# Altium PCB SOM_PCB_6Layer.PcbDoc (part 1 of 6)
Units mil, origin at the board's own origin, x right, y up, seen from the top; angles counter-clockwise.
Board outline 1230 x 2725 mil, 6 copper layers (Top Layer, GND+SHIELD, MidLayer1, MidLayer2, PWR, Bottom Layer), stack 60.8 mil thick; 76 components, 194 nets, 972 pads, 577 vias.
Unrouted connection lines stored in the file: 151.
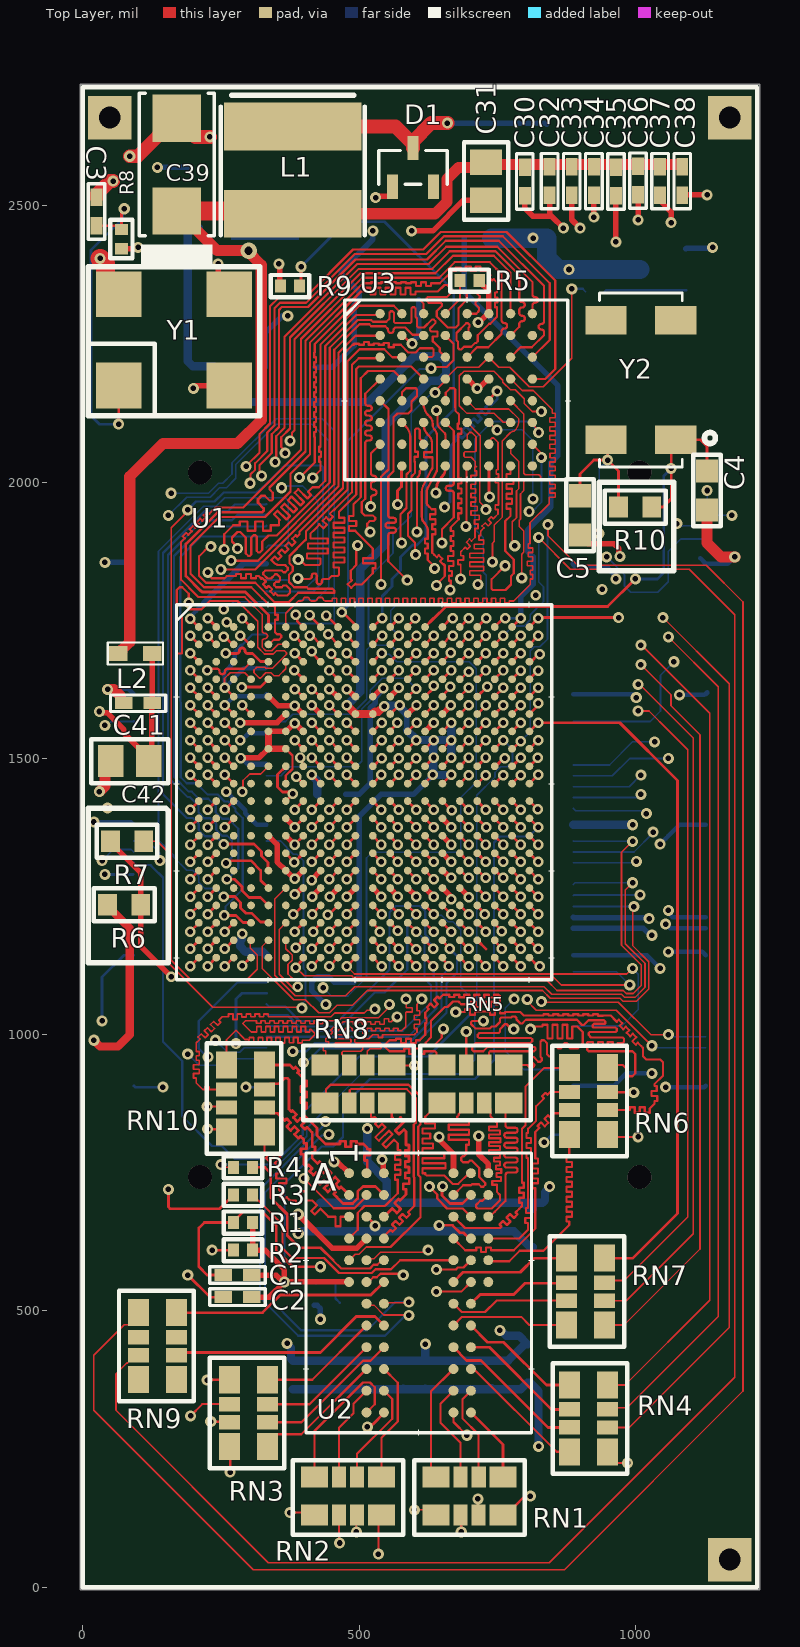
[diagram p0: Top Layer view]
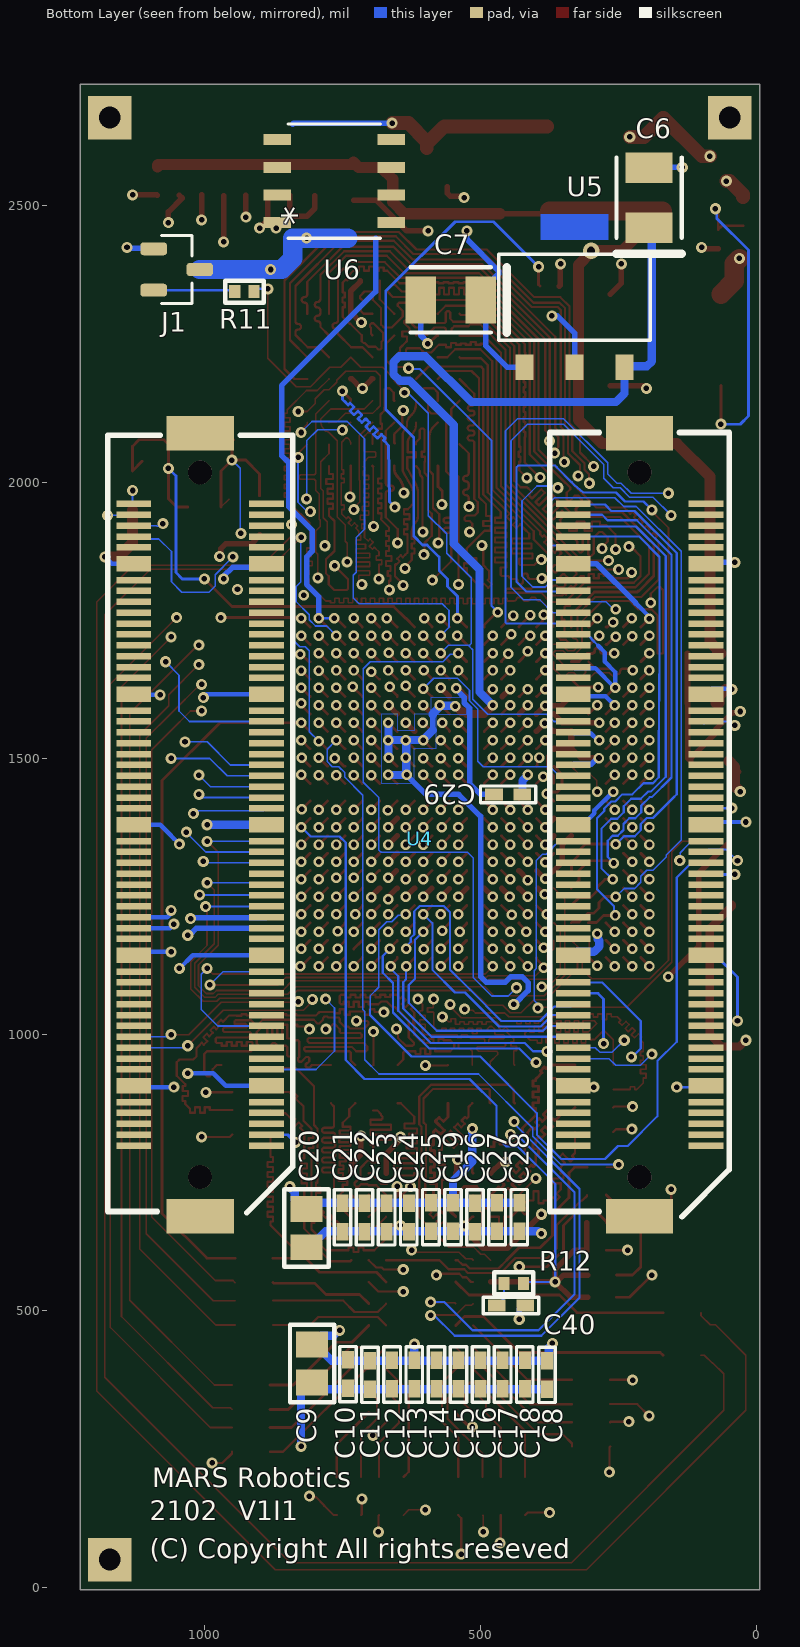
[diagram p1: Bottom Layer view, seen from below]
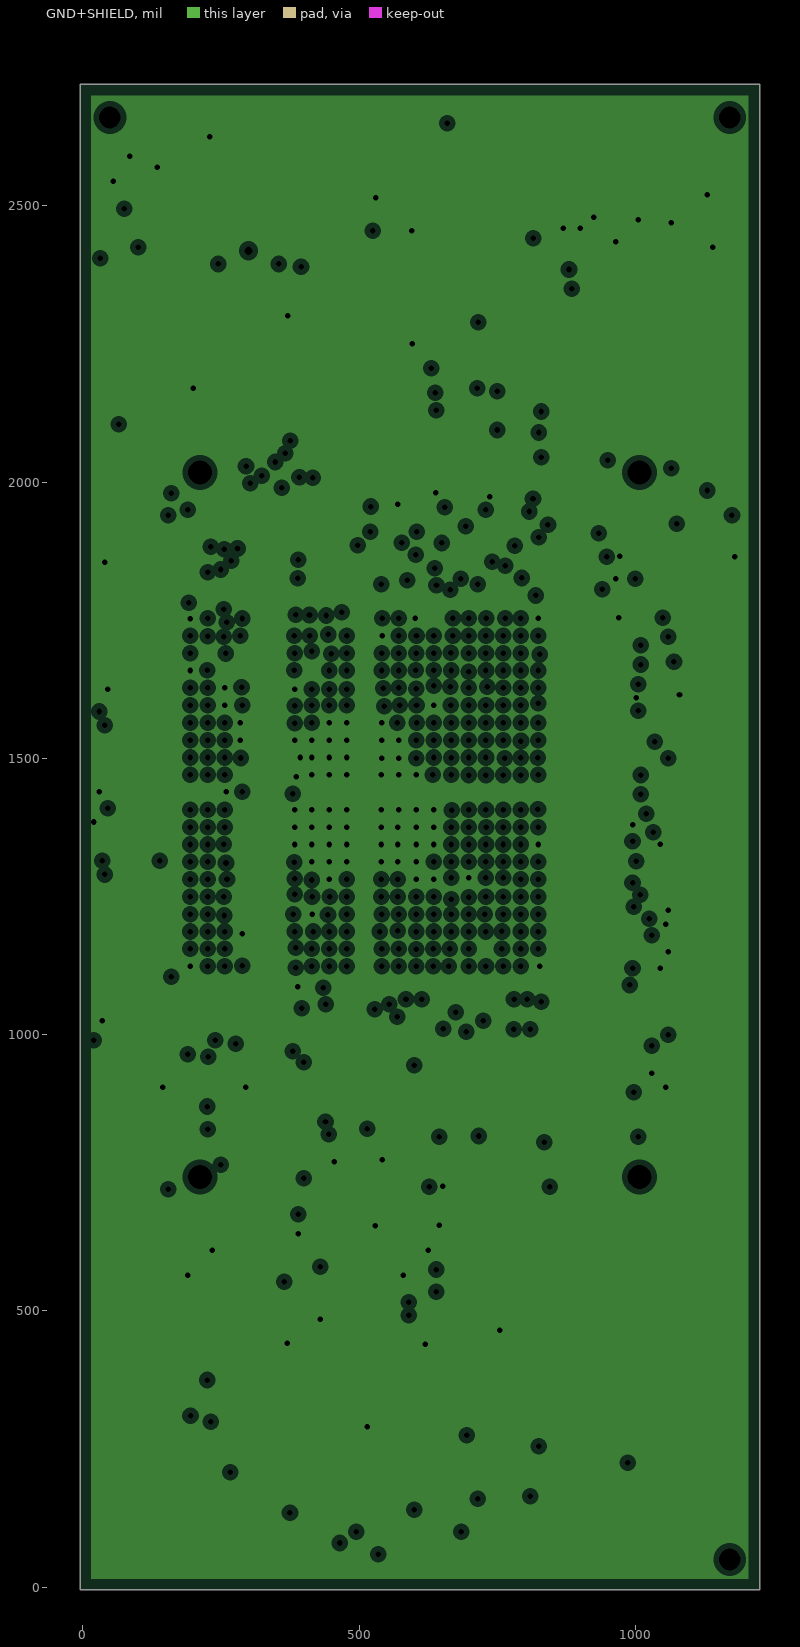
[diagram p2: GND+SHIELD, clearances drawn from the general rule]
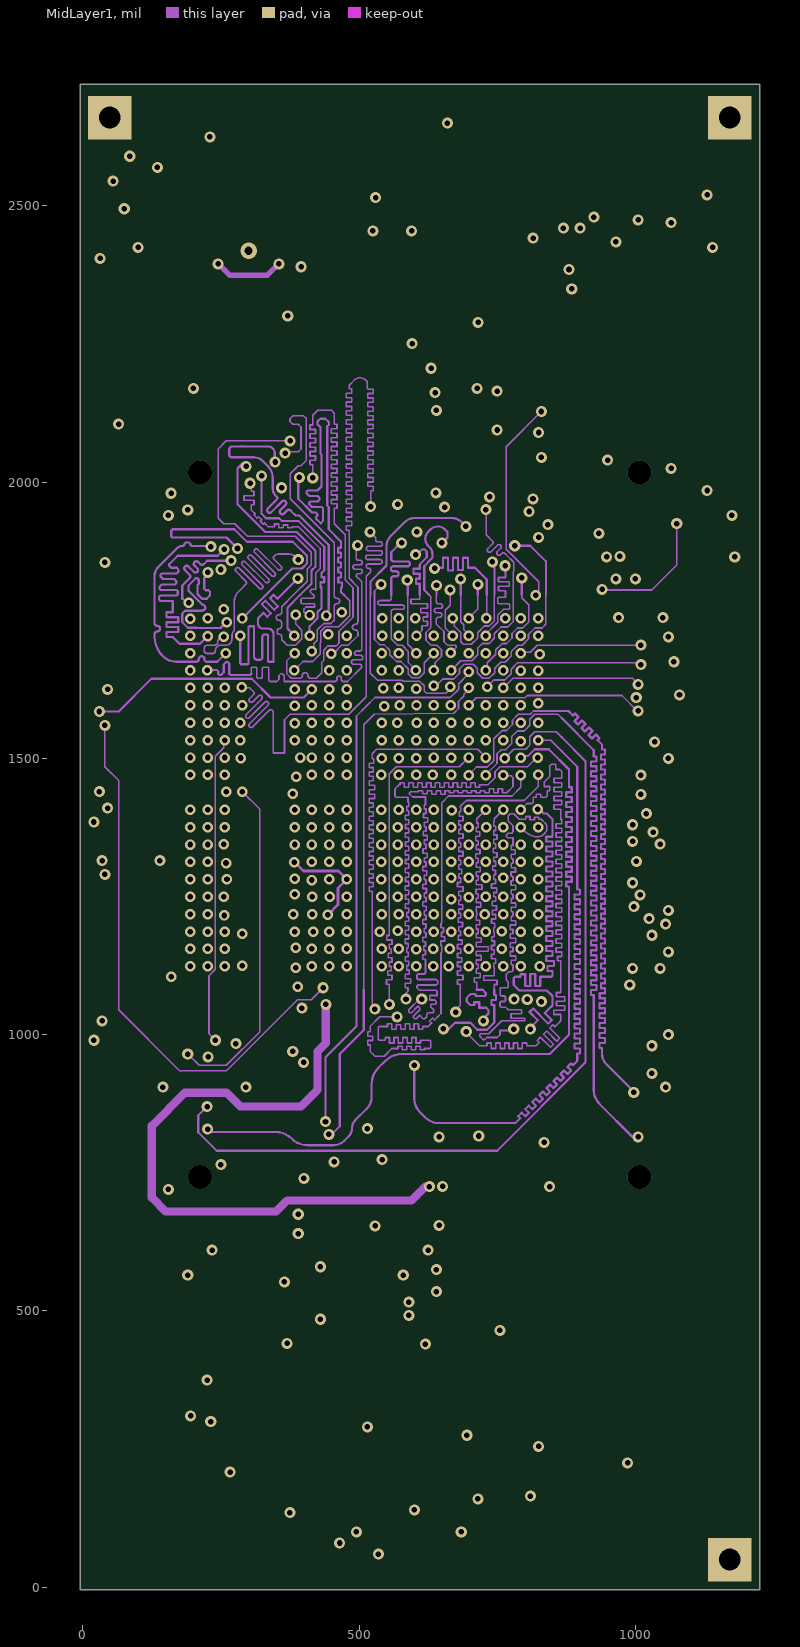
[diagram p3: MidLayer1]
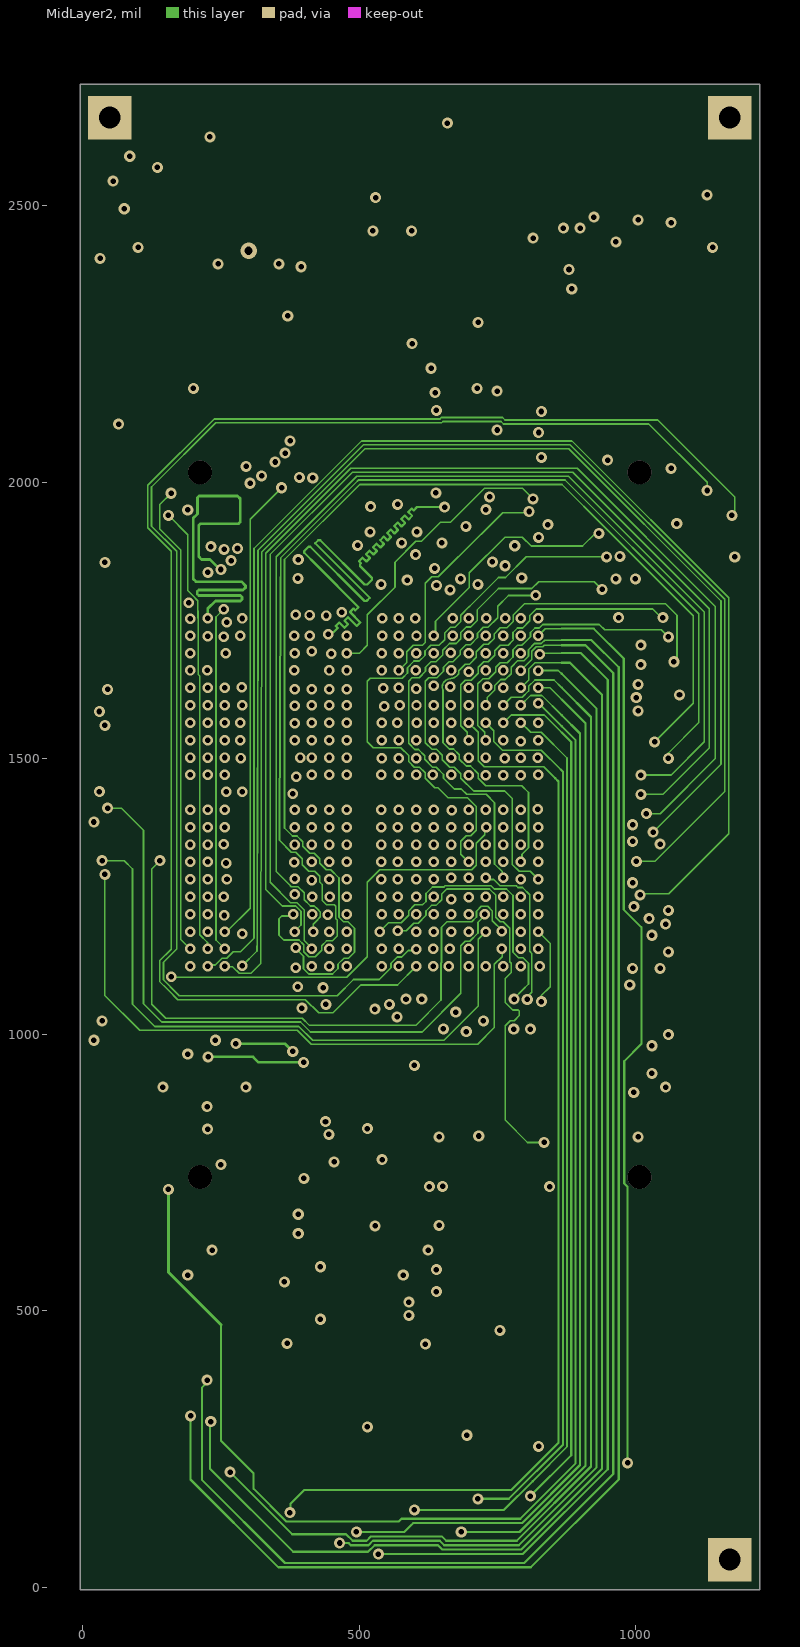
[diagram p4: MidLayer2]
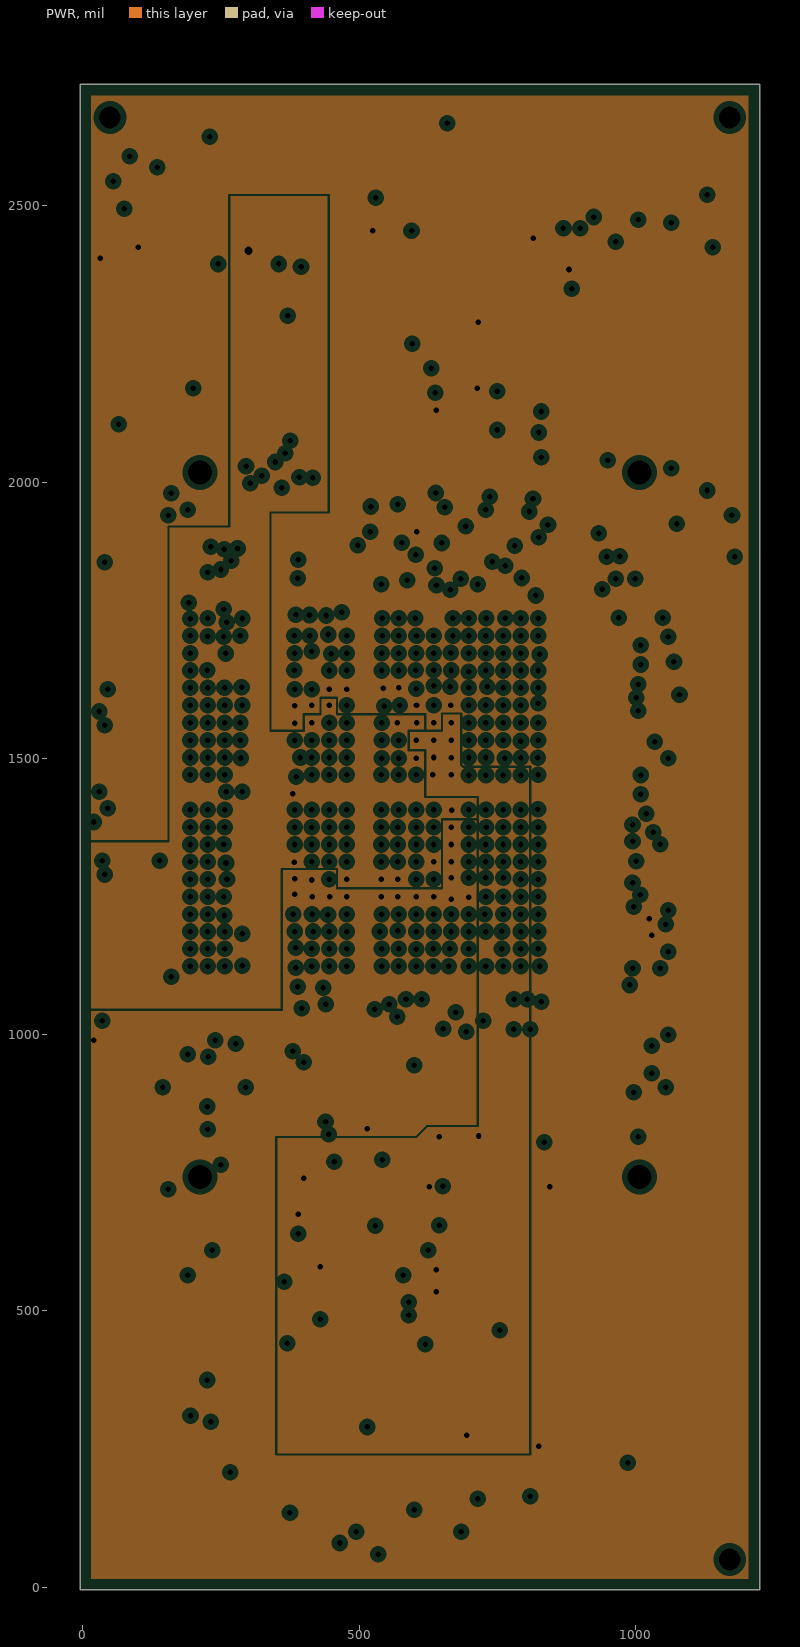
[diagram p5: PWR, clearances drawn from the general rule]

## Layer stack, top to bottom
Top Solder: solder mask 0.4, Solder Resist, Dk 3.5
Top Layer: signal copper 1.4
Dielectric1: core 9, FR-4, Dk 4.8
GND+SHIELD: plane copper 1.4, net GND
Dielectric4: prepreg 4.2, FR-4, Dk 4.8
MidLayer1: signal copper 1.4
Dielectric2: core 26, FR-4, Dk 4.8
MidLayer2: signal copper 1.4
Dielectric3: prepreg 4.2, FR-4, Dk 4.8
PWR: plane copper 1.4, net (Multiple Nets)
Dielectric5: core 9, FR-4, Dk 4.8
Bottom Layer: signal copper 1.4
Bottom Solder: solder mask 0.4, Solder Resist, Dk 3.5

## Board outline
-5,-5 25,-5 1225,-5 1225,2720 -5,2720 -5,0

## Design rules (kind name [scope] priority, off if disabled: settings)
Clearance Clearance_BGA [WithinRoom('BGA')] p1: gap=3 ignorepadtopadclearanceinfootprint=FALSE
Clearance [All] p2: gap=4 ignorepadtopadclearanceinfootprint=FALSE
DiffPairsRouting DiffPairsRouting_Diff90 [InDifferentialPair('DDR_DCLK0') And  Not WithinRoom('BGA')] p1: maxlimit=40 minlimit=3 mostfreqgap=25 toplayer_maxgap=6 toplayer_prefgap=4 toplayer_minwidth=3 toplayer_maxwidth=5 toplayer_prefwidth=4 midlayer1_mingap=4 midlayer1_minwidth=4 midlayer1_maxwidth=4 midlayer1_prefwidth=4 midlayer2_maxgap=6 midlayer2_prefgap=4 midlayer2_minwidth=3 midlayer2_maxwidth=5 midlayer2_prefwidth=4 bottomlayer_maxgap=6 bottomlayer_prefgap=4 bottomlayer_minwidth=3 bottomlayer_maxwidth=5 bottomlayer_prefwidth=4 maxuncoupledlength=500
DiffPairsRouting [All] p2: maxlimit=10 minlimit=10 mostfreqgap=10 toplayer_minwidth=15 toplayer_maxwidth=15 toplayer_prefwidth=15 midlayer1_minwidth=15 midlayer1_maxwidth=15 midlayer1_prefwidth=15 midlayer2_minwidth=15 midlayer2_maxwidth=15 midlayer2_prefwidth=15 bottomlayer_minwidth=15 bottomlayer_maxwidth=15 bottomlayer_prefwidth=15 maxuncoupledlength=500
HoleToHoleClearance [All] p1: gap=0 allowstackedmicrovias=TRUE
MatchedLengths DDR_DATA_LENGTH_MATCH [InNetClass('DDR_D[0..15]')] p1: tolerance=60 checknetsindiffpair=FALSE checkdiffpairvsdiffpair=TRUE checkxsignals=TRUE checkothers=TRUE
MatchedLengths DDR_RES_DATA_LENGTH_MATCH [InNetClass('DDR_RES_D[0..15]')] p2: tolerance=250 checknetsindiffpair=FALSE checkdiffpairvsdiffpair=TRUE checkxsignals=TRUE checkothers=TRUE
MatchedLengths FLASH_DATA_LENGTH_MATCH [InNetClass('FLASH_DATA')] p3: tolerance=100 checknetsindiffpair=FALSE checkdiffpairvsdiffpair=TRUE checkxsignals=TRUE checkothers=TRUE
MatchedLengths FLASH_ADD_LENGTH_MATCH [InNetClass('FLASH_A[1..24]')] p4: tolerance=250 checknetsindiffpair=FALSE checkdiffpairvsdiffpair=TRUE checkxsignals=TRUE checkothers=TRUE
MinimumSolderMaskSliver [All] p1: minsoldermaskwidth=0
PlaneClearance [All] p1: clearance=10
PlaneConnect PlaneConnect_DIRECT [IsVia] p1: planeconnectstyle=Direct reliefexpansion=20 reliefentries=4 reliefconductorwidth=5 reliefairgap=10
PlaneConnect PlaneConnect_RELIEF [All] p2: planeconnectstyle=Relief reliefexpansion=10 reliefentries=4 reliefconductorwidth=20 reliefairgap=4
PolygonConnect [All] p1: connectstyle=Relief reliefconductorwidth=10 reliefentries=4 polygonreliefangle="90 Angle" airgapwidth=10
RoomDefinition BGA [InComponentClass('Room Definition 1')] p1: confinementstyle=ConfineIn formatcopy=TRUE lockcomponents=FALSE outline 151.75,1081.24 151.75,1796.24 866.75,1796.24 866.75,1081.24
RoutingVias RoutingVias_BGA [WithinRoom('BGA')] p1: holewidth=10 width=19 viastyle="Through Hole" minholewidth=10 minwidth=19 maxholewidth=10 maxwidth=19
RoutingVias [All] p2: holewidth=10 width=20 viastyle="Through Hole" minholewidth=10 minwidth=20 maxholewidth=40 maxwidth=45
SilkToSilkClearance [All] p1: silktosilkclearance=0
SilkToSolderMaskClearance [IsPad] p1: minsilkscreentomaskgap=0 clearancetoexposedcopper=TRUE
SolderMaskExpansion [All] p1: expansion=4 istentingtop=FALSE
Width Width_BGA [WithinRoom('BGA')] p1: maxlimit=15 minlimit=3 preferedwidth=5 midlayer1_prefwidth=3 midlayer2_prefwidth=3 minimp=50.000000 maximp=50.000000 favimp=50.000000
Width [All] p2: maxlimit=35 minlimit=3 preferedwidth=5
23 further rules are at their usual default settings.

## Classes and differential pairs
component class Designator: U1
net class UART: UART2_RX UART2_TX UART3_RX UART3_TX
net class TIMER: TACLK6 TMR0 TMR1 TMR2 TMR3 TMR4 TMR5 TMR6 UART3_RX
net class SD_DATA: RSCLK0 SD_CLK SD_CMD SD_D0 SD_D1 SD_D2 SD_D3
net class JTAG: JTAG_E\M\U\ JTAG_T\R\S\T\ JTAG_TCK JTAG_TDI JTAG_TDO JTAG_TMS
net class FLASH_DATA: FLASH_D0 FLASH_D1 FLASH_D2 FLASH_D3 FLASH_D4 FLASH_D5 FLASH_D6 FLASH_D7 FLASH_D8 FLASH_D9 FLASH_D10 FLASH_D11 FLASH_D12 FLASH_D13 FLASH_D14 FLASH_D15
net class FLASH_D[0..15]: FLASH_D0 FLASH_D1 FLASH_D2 FLASH_D3 FLASH_D4 FLASH_D5 FLASH_D6 FLASH_D7 FLASH_D8 FLASH_D9 FLASH_D10 FLASH_D11 FLASH_D12 FLASH_D13 FLASH_D14 FLASH_D15
net class FLASH_CLK: FLASH_CLK
net class FLASH_ADDR: FLASH_A1 FLASH_A2 FLASH_A3 FLASH_A4 FLASH_A5 FLASH_A6 FLASH_A7 FLASH_A8 FLASH_A9 FLASH_A10 FLASH_A11 FLASH_A12 FLASH_A13 FLASH_A14 FLASH_A15 FLASH_A16 FLASH_A17 FLASH_A18 FLASH_A19 FLASH_A20 FLASH_A21 FLASH_A22 FLASH_A23
net class FLASH_A[1..24]: FLASH_A1 FLASH_A2 FLASH_A3 FLASH_A4 FLASH_A5 FLASH_A6 FLASH_A7 FLASH_A8 FLASH_A9 FLASH_A10 FLASH_A11 FLASH_A12 FLASH_A13 FLASH_A14 FLASH_A15 FLASH_A16 FLASH_A17 FLASH_A18 FLASH_A19 FLASH_A20 FLASH_A21 FLASH_A22 FLASH_A23
net class DIFF100: DDR_DCLK0_N DDR_DCLK0_P
net class DDR_RES_D[0..15]: DDR_RES_D0 DDR_RES_D1 DDR_RES_D2 DDR_RES_D3 DDR_RES_D4 DDR_RES_D5 DDR_RES_D6 DDR_RES_D7 DDR_RES_D8 DDR_RES_D9 DDR_RES_D10 DDR_RES_D11 DDR_RES_D12 DDR_RES_D13 DDR_RES_D14 DDR_RES_D15
net class DDR_RES_A[0..12]: DDR_RES_A0 DDR_RES_A1 DDR_RES_A2 DDR_RES_A3 DDR_RES_A4 DDR_RES_A5 DDR_RES_A6 DDR_RES_A7 DDR_RES_A8 DDR_RES_A9 DDR_RES_A10 DDR_RES_A11 DDR_RES_A12
net class DDR_DATA: DDR_D0 DDR_D1 DDR_D2 DDR_D3 DDR_D4 DDR_D5 DDR_D6 DDR_D7 DDR_D8 DDR_D9 DDR_D10 DDR_D11 DDR_D12 DDR_D13 DDR_D14 DDR_D15 DDR_RES_D0 DDR_RES_D1 DDR_RES_D2 DDR_RES_D3 DDR_RES_D4 DDR_RES_D5 DDR_RES_D6 DDR_RES_D7 DDR_RES_D8 DDR_RES_D9 DDR_RES_D10 DDR_RES_D11 DDR_RES_D12 DDR_RES_D13 DDR_RES_D14 DDR_RES_D15
net class DDR_D[0..15]: DDR_D0 DDR_D1 DDR_D2 DDR_D3 DDR_D4 DDR_D5 DDR_D6 DDR_D7 DDR_D8 DDR_D9 DDR_D10 DDR_D11 DDR_D12 DDR_D13 DDR_D14 DDR_D15
net class DDR_ADDR: DDR_A0 DDR_A1 DDR_A2 DDR_A3 DDR_A4 DDR_A5 DDR_A6 DDR_A7 DDR_A8 DDR_A9 DDR_A10 DDR_A11 DDR_A12 DDR_RES_A0 DDR_RES_A1 DDR_RES_A2 DDR_RES_A3 DDR_RES_A4 DDR_RES_A5 DDR_RES_A6 DDR_RES_A7 DDR_RES_A8 DDR_RES_A9 DDR_RES_A10 DDR_RES_A11 DDR_RES_A12
net class DDR_A[0..12]: DDR_A0 DDR_A1 DDR_A2 DDR_A3 DDR_A4 DDR_A5 DDR_A6 DDR_A7 DDR_A8 DDR_A9 DDR_A10 DDR_A11 DDR_A12
component class Designator: C6 C7 C8 C9 C10 C11 C12 C13 C14 C15 C16 C17 C18 C19 C20 C21 C22 C23 C24 C25 C26 C27 C28 C29 C30 C31 C32 C33 C34 C35 C36 C37 C38 C39 C40 C41 C42 D1 L1 L2 R12 U5 U6
differential pair DDR_DCLK0: +DDR_DCLK0_P -DDR_DCLK0_N

## Components (designator, comment, footprint, x,y, rotation, side; value= is the part's Value field where it differs from the comment)
C1 "0.1 uF" CAP0402 280,565 r180 top
C2 "0.1 uF" CAP0402 280,525 r0 top
C3 "0.1µF" CAP0402 25,2490 r270 top
C4 "18pF" CAP0603 1130,1985 r90 top
C5 "18pF" CAP0603 900,1940 r90 top
C6 "1 uF" CAP_TANT_B 195,2515 r90 bottom
C7 "1 uF" CAP_TANT_B 554.13,2330 r0 bottom
C8 "0.01uF" CAP0402 380,384.24 r270 bottom
C9 "10uF" CAP0805 805,405 r270 bottom
C10 "0.01uF" CAP0402 740,385.76 r270 bottom
C11 "0.01uF" CAP0402 700,384.24 r270 bottom
C12 "0.01uF" CAP0402 660,385 r270 bottom
C13 "0.01uF" CAP0402 620,385 r270 bottom
C14 "0.01uF" CAP0402 580,385 r270 bottom
C15 "0.01uF" CAP0402 540,385 r270 bottom
C16 "0.01uF" CAP0402 500,385 r270 bottom
C17 "0.01uF" CAP0402 460,385 r270 bottom
C18 "0.01uF" CAP0402 420,385 r270 bottom
C19 "0.01uF" CAP0402 550,670 r90 bottom
C20 "10uF" CAP0805 815,650 r90 bottom
C21 "0.01uF" CAP0402 750,669.24 r90 bottom
C22 "0.01uF" CAP0402 710,669.24 r90 bottom
C23 "0.01uF" CAP0402 670,669.24 r90 bottom
C24 "0.01uF" CAP0402 630,669.24 r90 bottom
C25 "0.01uF" CAP0402 590,670 r90 bottom
C26 "0.01uF" CAP0402 510,669.24 r90 bottom
C27 "0.01uF" CAP0402 470,670 r90 bottom
C28 "0.01uF" CAP0402 430,670 r90 bottom
C29 "0.01uF" CAP0402 450,1435 r0 bottom
C30 "0.01uF" CAP0402 800,2544.24 r90 top
C31 "10uF" CAP0805 730,2545 r90 top
C32 "0.01uF" CAP0402 845,2545 r90 top
C33 "0.01uF" CAP0402 885,2545 r90 top
C34 "0.01uF" CAP0402 925,2545 r90 top
C35 "0.01uF" CAP0402 965,2544.24 r90 top
C36 "0.01uF" CAP0402 1005,2545.76 r90 top
C37 "0.01uF" CAP0402 1045,2545 r90 top
C38 "0.01uF" CAP0402 1085,2545 r90 top
C39 "100 uF" CAP_TANT_C 170,2575 r90 top
C40 "0.01uF" CAP0402 445,510 r0 bottom
C41 "0.01uF" CAP0402 100,1600 r0 top
C42 "10uF" CAP0805 85,1495 r0 top
D1 "ZHCS1000" SOT23_3_TOS-L 597.6,2570 r0 top
J1 "TCM809SENB713" SOT-23B 1050,2385 r180 bottom
L1 "10uH" IND_5818_WE-TPC 380,2565 r270 top
L2 "600 Ohms @ 100MHz" IND-0603 95,1690 r0 top
R1 "1K" RES0402 290,660 r180 top
R2 "1K" RES0402 290,610 r0 top
R3 "33R" RES0402 290,710 r0 top
R4 "33R" RES0402 290,760 r0 top
R5 "10K" RES0402 700,2365 r0 top
R6 "0R" RES0603 75,1235 r180 top
R7 "0R" RES0603 80.12,1350 r0 top
R8 "10K" RES0402 70,2440 r90 top
R9 "33R" RES0402 375,2355 r0 top
R10 "10M" RES0603 999.88,1955 r180 top
R11 "470R" RES0402 927.48,2345 r180 bottom
R12 "1R" RES0402 440,550 r180 bottom
RN1 "CAY16-220J4LF" BO_CAY16 700,165 r90 top
RN2 "CAY16-220J4LF" BO_CAY16 480,165 r90 top
RN3 "CAY16-220J4LF" BO_CAY16 300,315 r0 top
RN4 "CAY16-220J4LF" BO_CAY16 915.5,305.5 r180 top
RN5 "CAY16-220J4LF" BO_CAY16 710.5,910.5 r270 top
RN6 "CAY16-220J4LF" BO_CAY16 915,880 r180 top
RN7 "CAY16-220J4LF" BO_CAY16 910,535 r180 top
RN8 "CAY16-220J4LF" BO_CAY16 498.65,910.5 r270 top
RN9 "CAY16-220J4LF" BO_CAY16 135.5,436.35 r0 top
RN10 "CAY16-220J4LF" BO_CAY16 294.5,884.5 r0 top
U1 "ADSP-BF548BBCZ-5A" BC_400_1_ADI 509.25,1438.74 r0 top
U2 "MT46V32M16CY-5B IT:J" FBGA60_10X12P5_MRN 607.99,532.83 r0 top
U3 "PC28F128P33BF60A" BGA64_8X10_MRN 675.94,2167.2 r0 top
U4 "CM-BF548" CM-BF548 610,1380 r270 top locked
U5 "TC1262-2.5VDBTR" SOT-223 330,2335 r180 bottom
U6 "FDS9926A" SOIC8 765,2545 r90 bottom
Y1 "25MHz" 4-SMD 65,2340.35 r0 top
Y2 "32.768kHz" XTAL_ECS-.327-12.5-17-TR 1010,2185 r90 top

## Footprints (in the part's own frame and the unit in brackets; to place one, negate y for a bottom-side part, rotate by r counter-clockwise, add the part's x,y. Pads: shape width x height; smd on the part's side, far side on the other; paste and mask are expansions set on the pad)
4-SMD [mm]
  rect 2.1x2.1 smd: 1(0,-4.2) 2(5.08,-4.2) 3(5.08,0) 4(0,0)
  silkscreen extent -1.4,-5.59 6.48,1.27, body extent -1.02,-4.44 5.98,0.56, height 1.51
BC_400_1_ADI [mil]
  round 14 smd paste+0 mask+0: A1(-299.21,299.21) A2(-267.72,299.21) A3(-236.22,299.21) A4(-204.72,299.21) A5(-173.23,299.21) A6(-141.73,299.21) A7(-110.24,299.21) A8(-78.74,299.21) A9(-47.24,299.21) A10(-15.75,299.21) A11(15.75,299.21) A12(47.24,299.21) A13(78.74,299.21) A14(110.24,299.21) A15(141.73,299.21) A16(173.23,299.21) A17(204.72,299.21) A18(236.22,299.21) A19(267.72,299.21) A20(299.21,299.21) B1(-299.21,267.72) B2(-267.72,267.72) B3(-236.22,267.72) B4(-204.72,267.72) B5(-173.23,267.72) B6(-141.73,267.72) B7(-110.24,267.72) B8(-78.74,267.72) B9(-47.24,267.72) B10(-15.75,267.72) B11(15.75,267.72) B12(47.24,267.72) B13(78.74,267.72) B14(110.24,267.72) B15(141.73,267.72) B16(173.23,267.72) B17(204.72,267.72) B18(236.22,267.72) B19(267.72,267.72) B20(299.21,267.72) C1(-299.21,236.22) C2(-267.72,236.22) C3(-236.22,236.22) C4(-204.72,236.22) C5(-173.23,236.22) C6(-141.73,236.22) C7(-110.24,236.22) C8(-78.74,236.22) C9(-47.24,236.22) C10(-15.75,236.22) C11(15.75,236.22) C12(47.24,236.22) C13(78.74,236.22) C14(110.24,236.22) C15(141.73,236.22) C16(173.23,236.22) C17(204.72,236.22) C18(236.22,236.22) C19(267.72,236.22) C20(299.21,236.22) D1(-299.21,204.72) D2(-267.72,204.72) D3(-236.22,204.72) D4(-204.72,204.72) D5(-173.23,204.72) D6(-141.73,204.72) D7(-110.24,204.72) D8(-78.74,204.72) D9(-47.24,204.72) D10(-15.75,204.72) D11(15.75,204.72) D12(47.24,204.72) D13(78.74,204.72) D14(110.24,204.72) D15(141.73,204.72) D16(173.23,204.72) D17(204.72,204.72) D18(236.22,204.72) D19(267.72,204.72) D20(299.21,204.72) E1(-299.21,173.23) E2(-267.72,173.23) E3(-236.22,173.23) E4(-204.72,173.23) E5(-173.23,173.23) E6(-141.73,173.23) E7(-110.24,173.23) E8(-78.74,173.23) E9(-47.24,173.23) E10(-15.75,173.23) E11(15.75,173.23) E12(47.24,173.23) E13(78.74,173.23) E14(110.24,173.23) E15(141.73,173.23) E16(173.23,173.23) E17(204.72,173.23) E18(236.22,173.23) E19(267.72,173.23) E20(299.21,173.23) F1(-299.21,141.73) F2(-267.72,141.73) F3(-236.22,141.73) F4(-204.72,141.73) F5(-173.23,141.73) F6(-141.73,141.73) F7(-110.24,141.73) F8(-78.74,141.73) F9(-47.24,141.73) F10(-15.75,141.73) F11(15.75,141.73) F12(47.24,141.73) F13(78.74,141.73) F14(110.24,141.73) F15(141.73,141.73) F16(173.23,141.73) F17(204.72,141.73) F18(236.22,141.73) F19(267.72,141.73) F20(299.21,141.73) G1(-299.21,110.24) G2(-267.72,110.24) G3(-236.22,110.24) G4(-204.72,110.24) G5(-173.23,110.24) G6(-141.73,110.24) G7(-110.24,110.24) G8(-78.74,110.24) G9(-47.24,110.24) G10(-15.75,110.24) G11(15.75,110.24) G12(47.24,110.24) G13(78.74,110.24) G14(110.24,110.24) G15(141.73,110.24) G16(173.23,110.24) G17(204.72,110.24) G18(236.22,110.24) G19(267.72,110.24) G20(299.21,110.24) H1(-299.21,78.74) H2(-267.72,78.74) H3(-236.22,78.74) H4(-204.72,78.74) H5(-173.23,78.74) H6(-141.73,78.74) H7(-110.24,78.74) H8(-78.74,78.74) H9(-47.24,78.74) H10(-15.75,78.74) H11(15.75,78.74) H12(47.24,78.74) H13(78.74,78.74) H14(110.24,78.74) H15(141.73,78.74) H16(173.23,78.74) H17(204.72,78.74) H18(236.22,78.74) H19(267.72,78.74) H20(299.21,78.74) J1(-299.21,47.24) J2(-267.72,47.24) J3(-236.22,47.24) J4(-204.72,47.24) J5(-173.23,47.24) J6(-141.73,47.24) J7(-110.24,47.24) J8(-78.74,47.24) J9(-47.24,47.24) J10(-15.75,47.24) J11(15.75,47.24) J12(47.24,47.24) J13(78.74,47.24) J14(110.24,47.24) J15(141.73,47.24) J16(173.23,47.24) J17(204.72,47.24) J18(236.22,47.24) J19(267.72,47.24) J20(299.21,47.24) K1(-299.21,15.75) K2(-267.72,15.75) K3(-236.22,15.75) K4(-204.72,15.75) K5(-173.23,15.75) K6(-141.73,15.75) K7(-110.24,15.75) K8(-78.74,15.75) K9(-47.24,15.75) K10(-15.75,15.75) K11(15.75,15.75) K12(47.24,15.75) K13(78.74,15.75) K14(110.24,15.75) K15(141.73,15.75) K16(173.23,15.75) K17(204.72,15.75) K18(236.22,15.75) K19(267.72,15.75) K20(299.21,15.75) L1(-299.21,-15.75) L2(-267.72,-15.75) L3(-236.22,-15.75) L4(-204.72,-15.75) L5(-173.23,-15.75) L6(-141.73,-15.75) L7(-110.24,-15.75) L8(-78.74,-15.75) L9(-47.24,-15.75) L10(-15.75,-15.75) L11(15.75,-15.75) L12(47.24,-15.75) L13(78.74,-15.75) L14(110.24,-15.75) L15(141.73,-15.75) L16(173.23,-15.75) L17(204.72,-15.75) L18(236.22,-15.75) L19(267.72,-15.75) L20(299.21,-15.75) M1(-299.21,-47.24) M2(-267.72,-47.24) M3(-236.22,-47.24) M4(-204.72,-47.24) M5(-173.23,-47.24) M6(-141.73,-47.24) M7(-110.24,-47.24) M8(-78.74,-47.24) M9(-47.24,-47.24) M10(-15.75,-47.24) M11(15.75,-47.24) M12(47.24,-47.24) M13(78.74,-47.24) M14(110.24,-47.24) M15(141.73,-47.24) M16(173.23,-47.24) M17(204.72,-47.24) M18(236.22,-47.24) M19(267.72,-47.24) M20(299.21,-47.24) N1(-299.21,-78.74) N2(-267.72,-78.74) N3(-236.22,-78.74) N4(-204.72,-78.74) N5(-173.23,-78.74) N6(-141.73,-78.74) N7(-110.24,-78.74) N8(-78.74,-78.74) N9(-47.24,-78.74) N10(-15.75,-78.74) N11(15.75,-78.74) N12(47.24,-78.74) N13(78.74,-78.74) N14(110.24,-78.74) N15(141.73,-78.74) N16(173.23,-78.74) N17(204.72,-78.74) N18(236.22,-78.74) N19(267.72,-78.74) N20(299.21,-78.74) P1(-299.21,-110.24) P2(-267.72,-110.24) P3(-236.22,-110.24) P4(-204.72,-110.24) P5(-173.23,-110.24) P6(-141.73,-110.24) P7(-110.24,-110.24) P8(-78.74,-110.24) P9(-47.24,-110.24) P10(-15.75,-110.24) P11(15.75,-110.24) P12(47.24,-110.24) P13(78.74,-110.24) P14(110.24,-110.24) P15(141.73,-110.24) P16(173.23,-110.24) P17(204.72,-110.24) P18(236.22,-110.24) P19(267.72,-110.24) P20(299.21,-110.24) R1(-299.21,-141.73) R2(-267.72,-141.73) R3(-236.22,-141.73) R4(-204.72,-141.73) R5(-173.23,-141.73) R6(-141.73,-141.73) R7(-110.24,-141.73) R8(-78.74,-141.73) R9(-47.24,-141.73) R10(-15.75,-141.73) R11(15.75,-141.73) R12(47.24,-141.73) R13(78.74,-141.73) R14(110.24,-141.73) R15(141.73,-141.73) R16(173.23,-141.73) R17(204.72,-141.73) R18(236.22,-141.73) R19(267.72,-141.73) R20(299.21,-141.73) T1(-299.21,-173.23) T2(-267.72,-173.23) T3(-236.22,-173.23) T4(-204.72,-173.23) T5(-173.23,-173.23) T6(-141.73,-173.23) T7(-110.24,-173.23) T8(-78.74,-173.23) T9(-47.24,-173.23) T10(-15.75,-173.23) T11(15.75,-173.23) T12(47.24,-173.23) T13(78.74,-173.23) T14(110.24,-173.23) T15(141.73,-173.23) T16(173.23,-173.23) T17(204.72,-173.23) T18(236.22,-173.23) T19(267.72,-173.23) T20(299.21,-173.23) U1(-299.21,-204.72) U2(-267.72,-204.72) U3(-236.22,-204.72) U4(-204.72,-204.72) U5(-173.23,-204.72) U6(-141.73,-204.72) U7(-110.24,-204.72) U8(-78.74,-204.72) U9(-47.24,-204.72) U10(-15.75,-204.72) U11(15.75,-204.72) U12(47.24,-204.72) U13(78.74,-204.72) U14(110.24,-204.72) U15(141.73,-204.72) U16(173.23,-204.72) U17(204.72,-204.72) U18(236.22,-204.72) U19(267.72,-204.72) U20(299.21,-204.72) V1(-299.21,-236.22) V2(-267.72,-236.22) V3(-236.22,-236.22) V4(-204.72,-236.22) V5(-173.23,-236.22) V6(-141.73,-236.22) V7(-110.24,-236.22) V8(-78.74,-236.22) V9(-47.24,-236.22) V10(-15.75,-236.22) V11(15.75,-236.22) V12(47.24,-236.22) V13(78.74,-236.22) V14(110.24,-236.22) V15(141.73,-236.22) V16(173.23,-236.22) V17(204.72,-236.22) V18(236.22,-236.22) V19(267.72,-236.22) V20(299.21,-236.22) W1(-299.21,-267.72) W2(-267.72,-267.72) W3(-236.22,-267.72) W4(-204.72,-267.72) W5(-173.23,-267.72) W6(-141.73,-267.72) W7(-110.24,-267.72) W8(-78.74,-267.72) W9(-47.24,-267.72) W10(-15.75,-267.72) W11(15.75,-267.72) W12(47.24,-267.72) W13(78.74,-267.72) W14(110.24,-267.72) W15(141.73,-267.72) W16(173.23,-267.72) W17(204.72,-267.72) W18(236.22,-267.72) W19(267.72,-267.72) W20(299.21,-267.72) Y1(-299.21,-299.21) Y2(-267.72,-299.21) Y3(-236.22,-299.21) Y4(-204.72,-299.21) Y5(-173.23,-299.21) Y6(-141.73,-299.21) Y7(-110.24,-299.21) Y8(-78.74,-299.21) Y9(-47.24,-299.21) Y10(-15.75,-299.21) Y11(15.75,-299.21) Y12(47.24,-299.21) Y13(78.74,-299.21) Y14(110.24,-299.21) Y15(141.73,-299.21) Y16(173.23,-299.21) Y17(204.72,-299.21) Y18(236.22,-299.21) Y19(267.72,-299.21) Y20(299.21,-299.21)
  silkscreen extent -344,-344 344,344, body extent -334,-334 334,334, height 67
BGA64_8X10_MRN [mil]
  round 17 smd paste+0 mask+0: A1(-137.8,137.8) A2(-98.43,137.8) A3(-59.06,137.8) A4(-19.68,137.8) A5(19.68,137.8) A6(59.06,137.8) A7(98.43,137.8) A8(137.8,137.8) B1(-137.8,98.43) B2(-98.43,98.43) B3(-59.06,98.43) B4(-19.68,98.43) B5(19.68,98.43) B6(59.06,98.43) B7(98.43,98.43) B8(137.8,98.43) C1(-137.8,59.06) C2(-98.43,59.06) C3(-59.06,59.06) C4(-19.68,59.06) C5(19.68,59.06) C6(59.06,59.06) C7(98.43,59.06) C8(137.8,59.06) D1(-137.8,19.69) D2(-98.43,19.69) D3(-59.06,19.69) D4(-19.68,19.69) D5(19.68,19.69) D6(59.06,19.69) D7(98.43,19.69) D8(137.8,19.69) E1(-137.8,-19.68) E2(-98.43,-19.68) E3(-59.06,-19.68) E4(-19.68,-19.68) E5(19.68,-19.68) E6(59.06,-19.68) E7(98.43,-19.68) E8(137.8,-19.68) F1(-137.8,-59.06) F2(-98.43,-59.06) F3(-59.06,-59.06) F4(-19.68,-59.06) F5(19.68,-59.06) F6(59.06,-59.06) F7(98.43,-59.06) F8(137.8,-59.06) G1(-137.8,-98.43) G2(-98.43,-98.43) G3(-59.06,-98.43) G4(-19.68,-98.43) G5(19.68,-98.43) G6(59.06,-98.43) G7(98.43,-98.43) G8(137.8,-98.43) H1(-137.8,-137.8) H2(-98.43,-137.8) H3(-59.06,-137.8) H4(-19.68,-137.8) H5(19.68,-137.8) H6(59.06,-137.8) H7(98.43,-137.8) H8(137.8,-137.8)
  silkscreen extent -207,-168 207,168, body extent -197,-157 197,157, height 47
BO_CAY16 [mil]
  rect 38x49 smd: 1(-34.5,60.5) 4(-34.5,-60.5) 5(34.5,-60.5) 8(34.5,60.5)
  rect 38x26 smd mask+0: 2(-34.5,16.35) 3(-34.5,-16.3) 6(34.5,-16.35) 7(34.5,16.3)
  silkscreen extent -70,-100 65,100, body extent -36,-67 36,67, height 24
CAP0402 [mil]
  rect 31.84x21.68 smd paste+0 mask+0: 1(-25.76,0) 2(25.76,0)
  silkscreen extent -50,-15 50,15, body extent -20,-10 20,10, height 22
CAP0603 [mil]
  rect 42x40 smd paste+0 mask+0: 1(-35.5,0) 2(35.5,0)
  silkscreen extent -65,-25 65,25, body extent -34,-19 34,19, height 35
CAP0805 [mm]
  rect 1.18x1.47 smd: 1(-0.874,0) 2(0.874,0)
  silkscreen extent -1.78,-1.02 1.78,1.02, body extent -1.1,-0.69 1.1,0.76, height 0.86
CAP_TANT_B [mm] "Molded Capacitor, 2-Leads, Body 3.70x3.00mm, IPC High Density"
  rect 1.4x2.15 smd: 1(-1.375,0) 2(1.375,0)
  silkscreen extent -2.57,-1.5 1.85,1.5, body extent -2.07,-1.5 2.07,1.5, height 2.1
CAP_TANT_C [mil]
  rect 85.8x88.55 smd paste+0 mask+0: 1(-84.11,0) 2(84.11,0)
  silkscreen extent -190,-68 129,68, body extent -120,-64 120,68, height 106
CM-BF548 [mm]
  rect 0.3x1.6 smd far side paste-0.03: 1(14.75,-13.15) 2(14.25,-13.15) 3(13.75,-13.15) 4(13.25,-13.15) 5(12.75,-13.15) 6(11.25,-13.15) 7(10.75,-13.15) 8(10.25,-13.15) 9(9.75,-13.15) 10(9.25,-13.15) 11(8.75,-13.15) 12(8.25,-13.15) 13(7.75,-13.15) 14(7.25,-13.15) 15(6.75,-13.15) 16(5.25,-13.15) 17(4.75,-13.15) 18(4.25,-13.15) 19(3.75,-13.15) 20(3.25,-13.15) 21(2.75,-13.15) 22(2.25,-13.15) 23(1.75,-13.15) 24(1.25,-13.15) 25(0.75,-13.15) 26(-0.75,-13.15) 27(-1.25,-13.15) 28(-1.75,-13.15) 29(-2.25,-13.15) 30(-2.75,-13.15) 31(-3.25,-13.15) 32(-3.75,-13.15) 33(-4.25,-13.15) 34(-4.75,-13.15) 35(-5.25,-13.15) 36(-6.75,-13.15) 37(-7.25,-13.15) 38(-7.75,-13.15) 39(-8.25,-13.15) 40(-8.75,-13.15) 41(-9.25,-13.15) 42(-9.75,-13.15) 43(-10.25,-13.15) 44(-10.75,-13.15) 45(-11.25,-13.15) 46(-12.75,-13.15) 47(-13.25,-13.15) 48(-13.75,-13.15) 49(-14.25,-13.15) 50(-14.75,-13.15) 51(-14.75,-7.05) 52(-14.25,-7.05) 53(-13.75,-7.05) 54(-13.25,-7.05) 55(-12.75,-7.05) 56(-11.25,-7.05) 57(-10.75,-7.05) 58(-10.25,-7.05) 59(-9.75,-7.05) 60(-9.25,-7.05) 61(-8.75,-7.05) 62(-8.25,-7.05) 63(-7.75,-7.05) 64(-7.25,-7.05) 65(-6.75,-7.05) 66(-5.25,-7.05) 67(-4.75,-7.05) 68(-4.25,-7.05) 69(-3.75,-7.05) 70(-3.25,-7.05) 71(-2.75,-7.05) 72(-2.25,-7.05) 73(-1.75,-7.05) 74(-1.25,-7.05) 75(-0.75,-7.05) 76(0.75,-7.05) 77(1.25,-7.05) 78(1.75,-7.05) 79(2.25,-7.05) 80(2.75,-7.05) 81(3.25,-7.05) 82(3.75,-7.05) 83(4.25,-7.05) 84(4.75,-7.05) 85(5.25,-7.05) 86(6.75,-7.05) 87(7.25,-7.05) 88(7.75,-7.05) 89(8.25,-7.05) 90(8.75,-7.05) 91(9.25,-7.05) 92(9.75,-7.05) 93(10.25,-7.05) 94(10.75,-7.05) 95(11.25,-7.05) 96(12.75,-7.05) 97(13.25,-7.05) 98(13.75,-7.05) 99(14.25,-7.05) 100(14.75,-7.05) 101(14.75,7.05) 102(14.25,7.05) 103(13.75,7.05) 104(13.25,7.05) 105(12.75,7.05) 106(11.25,7.05) 107(10.75,7.05) 108(10.25,7.05) 109(9.75,7.05) 110(9.25,7.05) 111(8.75,7.05) 112(8.25,7.05) 113(7.75,7.05) 114(7.25,7.05) 115(6.75,7.05) 116(5.25,7.05) 117(4.75,7.05) 118(4.25,7.05) 119(3.75,7.05) 120(3.25,7.05) 121(2.75,7.05) 122(2.25,7.05) 123(1.75,7.05) 124(1.25,7.05) 125(0.75,7.05) 126(-0.75,7.05) 127(-1.25,7.05) 128(-1.75,7.05) 129(-2.25,7.05) 130(-2.75,7.05) 131(-3.25,7.05) 132(-3.75,7.05) 133(-4.25,7.05) 134(-4.75,7.05) 135(-5.25,7.05) 136(-6.75,7.05) 137(-7.25,7.05) 138(-7.75,7.05) 139(-8.25,7.05) 140(-8.75,7.05) 141(-9.25,7.05) 142(-9.75,7.05) 143(-10.25,7.05) 144(-10.75,7.05) 145(-11.25,7.05) 146(-12.75,7.05) 147(-13.25,7.05) 148(-13.75,7.05) 149(-14.25,7.05) 150(-14.75,7.05) 151(-14.75,13.15) 152(-14.25,13.15) 153(-13.75,13.15) 154(-13.25,13.15) 155(-12.75,13.15) 156(-11.25,13.15) 157(-10.75,13.15) 158(-10.25,13.15) 159(-9.75,13.15) 160(-9.25,13.15) 161(-8.75,13.15) 162(-8.25,13.15) 163(-7.75,13.15) 164(-7.25,13.15) 165(-6.75,13.15) 166(-5.25,13.15) 167(-4.75,13.15) 168(-4.25,13.15) 169(-3.75,13.15) 170(-3.25,13.15) 171(-2.75,13.15) 172(-2.25,13.15) 173(-1.75,13.15) 174(-1.25,13.15) 175(-0.75,13.15) 176(0.75,13.15) 177(1.25,13.15) 178(1.75,13.15) 179(2.25,13.15) 180(2.75,13.15) 181(3.25,13.15) 182(3.75,13.15) 183(4.25,13.15) 184(4.75,13.15) 185(5.25,13.15) 186(6.75,13.15) 187(7.25,13.15) 188(7.75,13.15) 189(8.25,13.15) 190(8.75,13.15) 191(9.25,13.15) 192(9.75,13.15) 193(10.25,13.15) 194(10.75,13.15) 195(11.25,13.15) 196(12.75,13.15) 197(13.25,13.15) 198(13.75,13.15) 199(14.25,13.15) 200(14.75,13.15)
  rect 0.7x1.6 smd far side paste-0.03: 201(12,-13.15) 202(6,-13.15) 203(0,-13.15) 204(-6,-13.15) 205(-12,-13.15) 206(-12,-7.05) 207(-6,-7.05) 208(0,-7.05) 209(6,-7.05) 210(12,-7.05) 213(12,7.05) 214(6,7.05) 215(0,7.05) 216(-6,7.05) 217(-12,7.05) 218(12,13.15) 219(6,13.15) 220(0,13.15) 221(-6,13.15) 222(-12,13.15)
  rect 1.6x3.1 smd far side: 211(18,-10.1) 212(-18,-10.1) 223(18,10.1) 224(-18,10.1)
  round 1.1 hole 1.1 unplated: h1(16.2,-10.1) h2(-16.2,-10.1) h3(16.2,10.1) h4(-16.2,10.1)
  rect 2x2 hole 1: H5(33.782,14.25) H6(-32.512,-14.25) H6(-32.512,14.25)
  silkscreen extent -33.91,-15.5 35.05,15.5, body extent -18.56,-13.11 18.63,13.07, height 3.51
FBGA60_10X12P5_MRN [mil]
  round 18 smd paste+0 mask+0: A1(-125.98,216.54) A2(-94.49,216.54) A3(-62.99,216.54) A7(62.99,216.54) A8(94.49,216.54) A9(125.98,216.54) B1(-125.98,177.17) B2(-94.49,177.17) B3(-62.99,177.17) B7(62.99,177.17) B8(94.49,177.17) B9(125.98,177.17) C1(-125.98,137.8) C2(-94.49,137.8) C3(-62.99,137.8) C7(62.99,137.8) C8(94.49,137.8) C9(125.98,137.8) D1(-125.98,98.43) D2(-94.49,98.43) D3(-62.99,98.43) D7(62.99,98.43) D8(94.49,98.43) D9(125.98,98.43) E1(-125.98,59.06) E2(-94.49,59.06) E3(-62.99,59.06) E7(62.99,59.06) E8(94.49,59.06) E9(125.98,59.06) F1(-125.98,19.69) F2(-94.49,19.69) F3(-62.99,19.69) F7(62.99,19.69) F8(94.49,19.69) F9(125.98,19.69) G2(-94.49,-19.68) G3(-62.99,-19.68) G7(62.99,-19.68) G8(94.49,-19.68) H2(-94.49,-59.06) H3(-62.99,-59.06) H7(62.99,-59.06) H8(94.49,-59.06) J2(-94.49,-98.43) J3(-62.99,-98.43) J7(62.99,-98.43) J8(94.49,-98.43) K2(-94.49,-137.8) K3(-62.99,-137.8) K7(62.99,-137.8) K8(94.49,-137.8) L2(-94.49,-177.17) L3(-62.99,-177.17) L7(62.99,-177.17) L8(94.49,-177.17) M2(-94.49,-216.54) M3(-62.99,-216.54) M7(62.99,-216.54) M8(94.49,-216.54)
  silkscreen extent -209,-258 209,258, body extent -199,-248 199,248, height 47
IND-0603 [mm] "Chip Inductor, 2-Leads, Body 1.6x0.8mm"
  rect 0.85x0.7 smd: 1(-0.775,0) 2(0.775,0)
  silkscreen extent -1.27,-0.51 1.27,0.51, body extent -0.8,-0.4 0.8,0.4, height 0.79
IND_5818_WE-TPC [mm]
  rect 2.2x6.3 smd: 1(-2,0) 2(2.01,0)
  silkscreen extent -3.43,-3.3 2.99,3.3, body extent -2.9,-2.77 2.9,3.03, height 2.54
RES0402 [mm]
  rect 0.51x0.6 smd: 1(-0.445,0) 2(0.445,0)
  silkscreen extent -0.89,-0.51 0.89,0.51, body extent -0.55,-0.25 0.45,0.25, height 0.3
RES0603 [mm]
  rect 0.86x0.98 smd: 1(-0.765,0) 2(0.765,0)
  silkscreen extent -1.4,-0.76 1.4,0.76, body extent -0.8,-0.4 0.8,0.4, height 0.45
SOIC8 [mil]
  rect 20x49.5 smd paste+0 mask+0: 1(-75,-103.25) 2(-25,-103.25) 3(25,-103.25) 4(75,-103.25) 5(75,103.25) 6(25,103.25) 7(-25,103.25) 8(-75,103.25)
  silkscreen extent -104,-84 104,84, body extent -122,-98 122,99, height 69
SOT23_3_TOS-L [mil]
  rect 20x44 smd paste+0 mask+0: 1(0,35) 2(37.4,-35) 3(-37.4,-35)
  silkscreen extent -62,-30 62,30, body extent -59,-45 55,45, height 39
SOT-23B [mm]
  rrect50% 1.23x0.59 smd: 1(-1.06,0.95) 2(-1.06,-0.95) 3(1.06,0)
  silkscreen extent -0.7,-1.56 0.7,1.56, body extent -1.32,-1.53 1.32,1.52, height 1.12
SOT-223 [mil]
  rect 33x46 smd paste+0 mask+0: 1(-90.55,-126.7) 2(0,-126.7) 3(90.55,-126.7)
  Top Layer region: 61,103.7 61,149.7 -61,149.7 -61,103.7
  silkscreen extent -137,-78 137,78, body extent -132,-144 132,144, height 71
XTAL_ECS-.327-12.5-17-TR [mm]
  rect 1.3x1.9 smd: 1(-2.75,-1.6) 2(2.75,-1.6) 3(2.75,1.6) 4(-2.75,1.6)
  silkscreen extent -4,-3.43 4,1.9, body extent -4.02,-1.9 4.02,1.9, height 2.5

## Part data
C1 C2: library part 0402ZD104KAT2A, "Chip Capacitor, 0.1 uF, +/- 10%, 10 V, -55 to 85 degC, 0402 (1005 Metric), RoHS, Tape and Reel", Capacitance="100 nF", Case Code (Imperial)=0402, Case Code (Metric)=1005, Max Operating Temperature="85 degC", Min Operating Temperature="-55 degC", Package Quantity=1, Tolerance=10%, Type (Capacitors)=X5R, Voltage Rating="10 V", Case\Package=0402, ComponentLink1Description="Manufacturer URL", ComponentLink1URL=http://www.avx.com/, ComponentLink2Description=Datasheet, ComponentLink2URL=http://datasheets.avx.com/cx5r.pdf, DatasheetVersion=05/2016, Height="0.56 mm", Length="1 mm", Mount="Surface Mount", Mounting Technology="Surface Mount", PackageDescription="2-Pin Surface Mount Device, Body 1 x 0.5 mm", PackageReference=0402, Packaging="Cut Tape", Pins=2, Radiation Hardening=No, REACH SVHC="No SVHC", RoHSCompliant=true, Voltage Rating (DC)="10 V", Width="0.5 mm"
C3: library part CL05B104KO5NNNC, "0.1µF ±10% 16V Ceramic Capacitor X7R 0402 (1005 Metric)", Digi-Key Part Number=1276-1001-2-ND, Manufacturer="Samsung Electro-Mechanics", Package / Case="0402 (1005 Metric)", Capacitance=0.1µF, Manufacturer Product Number=CL05B104KO5NNNC
C4 C5: library part 06035A180JAT4A, "18pF ±5% 50V Ceramic Capacitor C0G, NP0 0603 (1608 Metric)", Capacitance=AVX_2016-12-14_1, Digi-Key Part Number=478-10294-2-ND, Manufacturer="AVX Corporation", Package / Case="0603 (1608 Metric)", Manufacturer Product Number=06035A180JAT4A, Supplier="AVX Corporation"
C6 C7: library part T491B105M025AT, "Tantalum Capacitor, 1 uF, +/- 10%, 25 V, -55 to 125 degC, 1411 (3528 Metric), RoHS, Tape and Reel", Capacitance=1uF, Case Code=B, Case Style=Molded, Manufacturer=Kemet, Operating Temp Range=-55Cto125C, Package / Case=3528-21, Package Description="2-Pin Surface Mount Device, Body 3.5 x 2.8 mm", Package Reference=T491-B, Tolerance (+ or -)=10%, Voltage=25VDC, Construction=SMTChip, Datasheet URL=http://capacitoredge.kemet.com/capedge2/DataSheet/Datasheet-T491B105K025AT.pdf?pn=T491B105K025AT, Datasheet Version=10/2016, DCL=0.5uA, DF=4%, ESR=5ohm, Failure Rate=NotRequired, Insulation=NotRequired, Lead Spacing (nom)=NotRequiredmm, Length W/Weld=NotRequiredmm, Manufacturer URL=http://www.kemet.com/, Mounting Style=SurfaceMount, Mounting Technology=SurfaceMount, Packaging=TapeandReel, Polarity=Polar, Product Depth (mm)=2.8mm, Product Diameter (mm)=NotRequiredmm, Product Height (mm)=1.9mm, Product Length (mm)=3.5mm, Seal=NotRequired, Seated Plane Height=NotRequiredmm, Wire Form=NotRequired
C8 C10 C11 C12 C13 C14 C15 C16 C17 C18 C19 C21 C22 C23 C24 C25 C26 C27 C28 C29 C30 C32 C33 C34 C35 C36 C37 C38 C40 C41: library part CMP-2008-02797-1, "AVX - 0402YC103KAT2A - SMD Multilayer Ceramic Capacitor, 0,01 uF, 16 V, 0402 [1005 Metric], ± 10%, X7R, AVX 0402 MLCC", Capacitance=10nF, Case Code (Imperial)=0402, Case Code (Metric)=1005, Dielectric=X7R, Insulation Resistance=100GR, Manufacturer="AVX Interconnect / Elco", Manufacturer Part Number=0402YC103KAT2A, Max Operating Temperature=125°C, Min Operating Temperature=-55°C, Package Quantity=1, Tolerance=10%, Voltage=16V, Case/Package=0402, Category="Ceramic Capacitors", ComponentLink1Description=https://datasheet.ciiva.com/11788/0900766b80dc2409-11788541.pdf?src-supplier=RSComponents, ComponentLink1URL=https://datasheet.ciiva.com/11788/0900766b80dc2409-11788541.pdf?src-supplier=RSComponents, Contact Plating=Tin,Matte, Depth=0.5mm, Height=0.5mm, Lead Free="Lead Free", Length=1mm, Mount="Surface Mount", Packaging="Tape and Reel", Part Number=0402YC103KAT2A, Pricing 1="1=0.10000, 10=0.02100, 50=0.01120, 100=0.00920, 500=0.00654, 1000=0.00514, 2500=0.00468, 5000=0.00430 (USD)", Radiation Hardening=No, REACH SVHC="No SVHC", RoHS=Yes, Stock 1=1668180, Supplier 1=Digi-Key, Termination=SMD/SMT, Thickness=0.022inch, Voltage Rating=16V, Voltage Rating (DC)=16V, Width=0.5mm
C9 C20 C31 C42: library part 08056D106KAT2A, "Cap Ceramic 10uF 6.3V X5R 10% SMD 0805 85C Embossed T/R", Case Code (Imperial)=0805, Case Code (Metric)=2012, Dielectric=X5R, Dielectric Material=Ceramic, Insulation Resistance=500MR, Manufacturer="AVX Interconnect / Elco", Max Operating Temperature=85°C, Min Operating Temperature=-55°C, Package Quantity=1, Tolerance=10%, Voltage=6.3V, Capacitance=10uF, Case/Package=0805, Category="Ceramic Capacitors", ComponentLink1Description=https://datasheet.ciiva.com/11788/0900766b80def1a5-11788549.pdf?src-supplier=RSComponents, ComponentLink1URL=https://datasheet.ciiva.com/11788/0900766b80def1a5-11788549.pdf?src-supplier=RSComponents, Depth=1.25mm, Height=1.4mm, Lead Free="Lead Free", Length=2.01mm, Manufacturer Part Number=08056D106KAT2A, Mount="Surface Mount,PCB", Number of Pins=2, Packaging="Tape and Reel", Part Number=08056D106KAT2A, Pricing 1="1=0.24000, 10=0.16300, 50=0.09800, 100=0.08280, 500=0.05662, 1000=0.05009 (USD)", Radiation Hardening=No, REACH SVHC="No SVHC", RoHS=Yes, Stock 1=132568, Supplier 1=Digi-Key, Termination=SMD/SMT, Thickness=0.055inch, Voltage Rating=6.3V, Voltage Rating (DC)=6.3V, Width=1.25mm
C39: library part T495C107K006ATE075, "CAP TANT 100UF 6.3V 10% 2312", Capacitance=100uF, Case Code (Imperial)=2312, Case Code (Metric)=6032, Case/Package=Molded, ESR (Equivalent Series Resistance)=75mR, Leakage Current=6.3uA, Manufacturer=KEMET, Max Operating Temperature=125°C, Min Operating Temperature=-55°C, Package Quantity=1, Resistance=0.075R, Ripple Current=1.09A, Tolerance=10%, Voltage Rating=6.3V, Built_By=EMA_Frank, Category="Tantalum Capacitors", ComponentLink1Description=https://datasheet.ciiva.com/23810/1744558-23810593.pdf?src-supplier=Newark, ComponentLink1URL=https://datasheet.ciiva.com/23810/1744558-23810593.pdf?src-supplier=Newark, ComponentLink2Description=https://datasheet.ciiva.com/22691/1761160-22691450.pdf?src-supplier=Element14, ComponentLink2URL=https://datasheet.ciiva.com/22691/1761160-22691450.pdf?src-supplier=Element14, ComponentLink3Description=https://datasheet.ciiva.com/22691/1744558-22691451.pdf?src-supplier=Element14, ComponentLink3URL=https://datasheet.ciiva.com/22691/1744558-22691451.pdf?src-supplier=Element14, Copyright="Copyright (C) 2018 Accelerated Designs. All rights reserved", Depth=3.2mm, Dissipation Factor=8%, Features="General Purpose", Height=2.8mm, Height - Seated (Max)=0.11inch, Length=6mm, Life (Hours)=2000Hour, Manufacturer Part Number=T495C107K006ATE075, Manufacturer_Part_Number=T495C107K006ATE075, Mount="Surface Mount", Packaging="Tape and Reel", Polarity=Polar, Pricing 1="1=1.19000, 10=0.93800, 50=0.81260, 100=0.70310 (USD)", Radiation Hardening=No, REACH SVHC="No SVHC", RefDes=RefDes, RoHS=Yes, Source_Library=Kemet_2020-03-25_3.xlr, SourceLibrary=Kemet_2020-03-25_3, Stock 1=5300, Supplier 1=Digi-Key, Termination=SMD/SMT, Type=DEV, Vendor=Kemet, Voltage Rating (DC)=6.3V, Width=0.126inch
D1: "DIODES INC. - ZHCS1000 - Schottky Rectifier, 40 V, 1 A, Single, SOT-23, 3 Pins, 425 mV", Case/Package=SOT-23, Forward Current=1A, Forward Voltage=425mV, Manufacturer=Diodes, Max Forward Surge Current (Ifsm)=12A, Max Operating Temperature=125°C, Max Power Dissipation=500mW, Max Repetitive Reverse Voltage (Vrrm)=40V, Category="Rectifier Diodes", ComponentLink1Description=https://datasheet.ciiva.com/6932/1643161-6932065.pdf?src-supplier=Newark, ComponentLink1URL=https://datasheet.ciiva.com/6932/1643161-6932065.pdf?src-supplier=Newark, ComponentLink2Description=https://datasheet.ciiva.com/7964/312100-7964339.pdf?src-supplier=Element14, ComponentLink2URL=https://datasheet.ciiva.com/7964/312100-7964339.pdf?src-supplier=Element14, Element Configuration=Single, Manufacturer Part Number=ZHCS1000, Number of Pins=3, Packaging="Cut Tape", REACH SVHC="No SVHC", Reverse Recovery Time=12ns, RoHS=Yes, Supplier 1=Newark, Termination=SMD/SMT, Width=3.05mm
J1: "Supervisor Push-Pull, Totem Pole 1 Channel SOT-23-3", Digi-Key Part Number=TCM809SENB713TR-ND, Manufacturer="Microchip Technology", Package / Case="TO-236-3, SC-59, SOT-23-3", Manufacturer Product Number=TCM809SENB713
L1: library part 744053100, "10µH Shielded Wirewound Inductor 1.5A 70mOhm Max 2323 (5858 Metric)", Current Rating=1,5A, Digi-Key Part Number=732-1043-2-ND, Inductance=10µH, Manufacturer="Würth Elektronik", Package / Case="2323 (5858 Metric)", Manufacturer Product Number=744053100
L2: library part 732-2389-2-ND, "Ferritperle, 0603 [Metrisch 1608], 600 ohm, 500 mA, WE-CBF HF Series, 0.35 ohm, ± 25%", Case Code (Imperial)=0603, Case Code (Metric)=1608, Case/Package=SMD/SMT, DC Resistance (DCR)=350mR, Manufacturer="Wurth Electronics", Manufacturer Part Number=742863160, Max Current Rating=500mA, Max Operating Temperature=125°C, Min Operating Temperature=-55°C, Package Quantity=1, Test Frequency=100MHz, Tolerance=25%, Category="Ferrite Beads and Chips", ComponentLink1Description="Manufacturer Link", ComponentLink1URL=http://www.we-online.com, ComponentLink2Description=Datasheet, ComponentLink2URL=http://www.we-online.de/katalog/media/pdf/742863160.pdf, ComponentLink3Description=https://datasheet.ciiva.com/4939/742863160-51474-4939408.pdf?src-supplier=Mouser, ComponentLink3URL=https://datasheet.ciiva.com/4939/742863160-51474-4939408.pdf?src-supplier=Mouser, ComponentLink4Description=https://datasheet.ciiva.com/23763/742863160-23763056.pdf?src-supplier=Newark, ComponentLink4URL=https://datasheet.ciiva.com/23763/742863160-23763056.pdf?src-supplier=Newark, ComponentLink5Description=https://datasheet.ciiva.com/30490/0900766b812a6726-30490032.pdf?src-supplier=RSComponents, ComponentLink5URL=https://datasheet.ciiva.com/30490/0900766b812a6726-30490032.pdf?src-supplier=RSComponents, ComponentLink6Description=https://datasheet.ciiva.com/6212/742863160-6212664.pdf?src-supplier=Digi-Key, ComponentLink6URL=https://datasheet.ciiva.com/6212/742863160-6212664.pdf?src-supplier=Digi-Key, ComponentLink7Description=https://datasheet.ciiva.com/1466/1696149-1466636.pdf?src-supplier=Element14, ComponentLink7URL=https://datasheet.ciiva.com/1466/1696149-1466636.pdf?src-supplier=Element14, ComponentLink8Description=https://datasheet.ciiva.com/6212/742863160-6212666.pdf?src-supplier=Digi-Key, ComponentLink8URL=https://datasheet.ciiva.com/6212/742863160-6212666.pdf?src-supplier=Digi-Key, ComponentLink9Description=https://datasheet.ciiva.com/6212/742863160-6212667.pdf?src-supplier=Digi-Key, ComponentLink9URL=https://datasheet.ciiva.com/6212/742863160-6212667.pdf?src-supplier=Digi-Key, ComponentLink10Description=https://datasheet.ciiva.com/22711/1696149-22711452.pdf?src-supplier=Element14, ComponentLink10URL=https://datasheet.ciiva.com/22711/1696149-22711452.pdf?src-supplier=Element14, Core Material=Ferrite, DatasheetVersion="ver 2, Aug-2009", Depth=0.8mm, Height=0.8mm, Impedance="600 Ohm", Lead Free="Lead Free", Length=1.6mm, Max DC Current=500mA, Mount="Surface Mount", Number of Lines=1, Number of Pins=2, PackageDescription="Chip Inductor, 2-Leads, Body 1.6 x 0.8 mm", PackageReference=SMD-0603, PackageVersion=2009, Packaging="Tape and Reel", Pricing 1="1=0.22000, 50=0.21200, 100=0.20200, 500=0.18100, 1000=0.17100, 2000=0.16100 (USD)", REACH SVHC=Unknown, Resistance=350mR, RoHS=Yes, Stock 1=26940, Supplier 1=Digi-Key, Termination=SMD/SMT, Width=0.8mm
R1 R2: library part RT0402FRE071KL, "1 kOhms ±1% 0.063W, 1/16W Chip Resistor 0402 (1005 Metric)  Thin Film", Case Code (Imperial)=0402, Case Code (Metric)=1005, Manufacturer=Yageo, Max Operating Temperature=125°C, Max Power Dissipation=63mW, Min Operating Temperature=-55°C, Package Quantity=10000, Power Rating=62.5mW, Resistance=1kR, Resistor Type="Thin Film", Temperature Coefficient=50ppm/°C, Tolerance=1%, Voltage Rating=50V, Case/Package=0402, Category="Chip SMD Resistors", ComponentLink1Description=https://datasheet.ciiva.com/12834/pyu-rt-1-to-0-05-rohs-l-4-12834181.pdf?src-supplier=Mouser, ComponentLink1URL=https://datasheet.ciiva.com/12834/pyu-rt-1-to-0-05-rohs-l-4-12834181.pdf?src-supplier=Mouser, ComponentLink2Description=https://datasheet.ciiva.com/25647/pyu-rt-1-to-0-05-rohs-l-4-25647306.pdf?src-supplier=Digi-Key, ComponentLink2URL=https://datasheet.ciiva.com/25647/pyu-rt-1-to-0-05-rohs-l-4-25647306.pdf?src-supplier=Digi-Key, ComponentLink3Description=https://datasheet.ciiva.com/8896/pyu-rt-1-to-0-05-rohs-l-4-8896188.pdf?src-supplier=Avnet, ComponentLink3URL=https://datasheet.ciiva.com/8896/pyu-rt-1-to-0-05-rohs-l-4-8896188.pdf?src-supplier=Avnet, Contact Plating=Tin,Matte,Lead, Depth=0.5mm, Features="Moisture Resistant", Height=0.014inch, Lead Free="Lead Free", Length=1mm, Manufacturer Part Number=RT0402FRE071KL, Military Standard=Not, Number of Terminations=2, Packaging="Tape and Reel", Part Number=RT0402FRE071KL, Pricing 1="1=0.10000, 10=0.07000, 100=0.02830, 1000=0.01272, 2500=0.01104, 5000=0.00912 (USD)", Radiation Hardening=No, RoHS=Yes, Stock 1=115371, Supplier 1=Digi-Key, Termination=SMD/SMT, Voltage Rating (DC)=50V, Width=0.02inch
R3 R4 R9: library part CRCW040233R0JNEE, "33 Ohms ±5% 0.063W, 1/16W Chip Resistor 0402 (1005 Metric) Automotive AEC-Q200 Thick Film", Digi-Key Part Number=CRCW040233R0JNEE-ND, Manufacturer="Vishay Dale", Package / Case=0402, Manufacturer Product Number=CRCW040233R0JNEE, Resistance=33R, Supplier="Vishay Dale"
R5: library part CRCW040210K0FHEDP, "10 kOhms ±1% 0.063W, 1/16W Chip Resistor 0402 (1005 Metric) Automotive AEC-Q200 Thick Film", Digi-Key Part Number=CRCW040210K0FHEDP-ND, Manufacturer="Vishay Dale", Package / Case=0402, Manufacturer Product Number=CRCW040210K0FHEDP, Resistance=10K, Supplier="Vishay Dale"
R6 R7: library part CR0603AJ/-000EAS, "Res Anti-Sulfured Jumper Thick Film 0603 0 Ohm 1/10W Molded Paper T/R", Manufacturer=Bourns, Category="Chip SMD Resistors", Manufacturer Part Number=CR0603AJ/-000EAS, Pricing 1="1=0.01100 (USD)", RoHS=No, Stock 1=4944, Supplier 1=Avnet
R8: library part RE0402FRE0710KL, "10 kOhms ±1% 0.063W, 1/16W Chip Resistor 0402 (1005 Metric) Moisture Resistant Thick Film", Digi-Key Part Number=13-RE0402FRE0710KLTR-ND, Manufacturer=Yageo, Package / Case="0402 (1005 Metric)", Manufacturer Product Number=RE0402FRE0710KL, Supplier=Yageo
R10: library part CRCW060310M0FHEAP, "10 MOhms ±1% 0.1W, 1/10W Chip Resistor 0603 (1608 Metric) Automotive AEC-Q200 Thick Film", Digi-Key Part Number=CRCW060310M0FHEAP-ND, Manufacturer="Vishay Dale", Package / Case=0603, Resistance="10 MOhms", Manufacturer Product Number=CRCW060310M0FHEAP
R11: library part CRGCQ0402F470K, "470 kOhms ±1% 0.063W, 1/16W Chip Resistor 0402 (1005 Metric) Automotive AEC-Q200, Moisture Resistant Thick Film", Digi-Key Part Number=A129659TR-ND, Manufacturer="TE Connectivity Passive Product", Package / Case="0402 (1005 Metric)", Manufacturer Product Number=CRGCQ0402F470K, Supplier="TE Connectivity Passive Product"
R12: library part 541-1.00LCT-ND, "RES SMD 1 OHM 1% 1/16W 0402", Case Code (Imperial)=0402, Case Code (Metric)=1005, Manufacturer=Vishay, Manufacturer Part Number=CRCW04021R00FNED, Max Operating Temperature=155°C, Max Power Dissipation=63mW, Min Operating Temperature=-55°C, Package Quantity=10000, Resistor Type="Thick Film", Temperature Coefficient=200ppm/°C, Tolerance=1%, Voltage Rating=50V, Case/Package=0402, Category="Chip SMD Resistors", ComponentLink1Description=https://datasheet.ciiva.com/2560/dcrcwe3-2560101.pdf?src-supplier=Digi-Key, ComponentLink1URL=https://datasheet.ciiva.com/2560/dcrcwe3-2560101.pdf?src-supplier=Digi-Key, ComponentLink2Description=https://datasheet.ciiva.com/6027/1697337-6027861.pdf?src-supplier=Farnell, ComponentLink2URL=https://datasheet.ciiva.com/6027/1697337-6027861.pdf?src-supplier=Farnell, ComponentLink3Description=https://datasheet.ciiva.com/2560/dcrcwe3-2560102.pdf?src-supplier=Digi-Key, ComponentLink3URL=https://datasheet.ciiva.com/2560/dcrcwe3-2560102.pdf?src-supplier=Digi-Key, ComponentLink4Description=https://datasheet.ciiva.com/2560/dcrcwe3-2560103.pdf?src-supplier=Digi-Key, ComponentLink4URL=https://datasheet.ciiva.com/2560/dcrcwe3-2560103.pdf?src-supplier=Digi-Key, ComponentLink5Description=https://datasheet.ciiva.com/3256/dcrcwe3-3256199.pdf?src-supplier=Avnet, ComponentLink5URL=https://datasheet.ciiva.com/3256/dcrcwe3-3256199.pdf?src-supplier=Avnet, ComponentLink6Description=https://datasheet.ciiva.com/3256/dcrcwe3-3256200.pdf?src-supplier=Avnet, ComponentLink6URL=https://datasheet.ciiva.com/3256/dcrcwe3-3256200.pdf?src-supplier=Avnet, ComponentLink7Description=https://datasheet.ciiva.com/5552/dcrcwe3-109170-5552232.pdf?src-supplier=Mouser, ComponentLink7URL=https://datasheet.ciiva.com/5552/dcrcwe3-109170-5552232.pdf?src-supplier=Mouser, ComponentLink8Description=https://datasheet.ciiva.com/16436/dcrcwe3-16436173.pdf?src-supplier=Future+Electronics, ComponentLink8URL=https://datasheet.ciiva.com/16436/dcrcwe3-16436173.pdf?src-supplier=Future+Electronics, ComponentLink9Description=https://datasheet.ciiva.com/7841/125364-7841807.pdf?src-supplier=Element14, ComponentLink9URL=https://datasheet.ciiva.com/7841/125364-7841807.pdf?src-supplier=Element14, Contact Plating=Tin, Depth=0.5mm, Features="Automotive AEC-Q200", Height=0.016inch, Lead Free="Lead Free", Length=1mm, Military Standard=Not, Mount="Surface Mount", Number of Pins=2, Number of Terminations=2, Packaging="Tape and Reel", Power Rating=63mW, Pricing 1="1=0.10000, 10=0.05000, 100=0.02040, 1000=0.00914, 2500=0.00794, 5000=0.00656 (USD)", Radiation Hardening=No, REACH SVHC=Unknown, Resistance=1R, RoHS=Yes, Stock 1=7772, Supplier 1=Digi-Key, Termination=SMD/SMT, Voltage Rating (DC)=50V, Weight=2.3E-05oz, Width=0.02inch
RN1 RN2 RN3 RN4 RN5 RN6 RN7 RN8 RN9 RN10: "22 Ohm ±5% 62.5mW Power Per Element Isolated Resistor Network/Array ±200ppm/°C 1206 (3216 Metric), Convex, Long Side Terminals", Digi-Key Part Number=CAY16-220J4LFDKR-ND, Manufacturer="Bourns Inc.", Power Per Element=62.5mW, Tolerance=±5%, Manufacturer Product Number=CAY16-220J4LF
U1: "IC DSP 16BIT 533MHZ 400CSBGA", Manufacturer="Analog Devices Inc.", TypeDigi-Key Part Number=ADSP-BF548BBCZ-5A-ND, Manufacturer Product Number=ADSP-BF548BBCZ-5A, Manufacturer_Part_Number=ADSP-BF548BBCZ-5A, Supplier="Analog Devices Inc."
U2: library part "MT46V32M16CY-5B IT:J TR", "SDRAM - DDR Memory IC 512Mb (32M x 16) Parallel 200MHz 700ps 60-FBGA (8x12.5)", Digi-Key Part Number=MT46V32M16CY-5BIT:J-ND, Manufacturer="Micron Technology Inc.", Package / Case=60-TFBGA, Manufacturer Product Number="MT46V32M16CY-5B IT:J", Series=-, Supplier="Micron Technology Inc."
U3: "FLASH - NOR Memory IC 128Mb (8M x 16) Parallel 52MHz 60ns 64-EasyBGA (10x13)", Digi-Key Part Number=D:\embedded_systems\Projects\Pievision\BLACKFIN-SOM\Design, Manufacturer="Alliance Memory, Inc.", Package / Case=64-TBGA, Manufacturer Product Number=PC28F128P33BF60A, Series=StrataFlash, Supplier="Alliance Memory, Inc."
U5: "Linear Voltage Regulator IC  1 Output  500mA SOT-223-3", Case/Package=SOT-223-3, Dropout Voltage=350mV, Input Bias Current=80uA, Manufacturer=Microchip, Max Input Voltage=6V, Max Operating Temperature=125°C, Max Output Current=500mA, Min Input Voltage=2.7V, Min Operating Temperature=-40°C, Output Voltage=2.5V, Package Quantity=4000, Accuracy=0.5%, Category="Voltage Regulators - Linear", ComponentLink1Description=https://datasheet.ciiva.com/2056/filehandler-aspxddocname-en026002-2056324.pdf?src-supplier=Digi-Key, ComponentLink1URL=https://datasheet.ciiva.com/2056/filehandler-aspxddocname-en026002-2056324.pdf?src-supplier=Digi-Key, ComponentLink2Description=https://datasheet.ciiva.com/2056/filehandler-aspxddocname-en026002-2056325.pdf?src-supplier=Digi-Key, ComponentLink2URL=https://datasheet.ciiva.com/2056/filehandler-aspxddocname-en026002-2056325.pdf?src-supplier=Digi-Key, ComponentLink3Description=https://datasheet.ciiva.com/2056/filehandler-aspxddocname-en026002-2056326.pdf?src-supplier=Digi-Key, ComponentLink3URL=https://datasheet.ciiva.com/2056/filehandler-aspxddocname-en026002-2056326.pdf?src-supplier=Digi-Key, ComponentLink4Description=https://datasheet.ciiva.com/8239/21373b-8239238.pdf?src-supplier=Avnet, ComponentLink4URL=https://datasheet.ciiva.com/8239/21373b-8239238.pdf?src-supplier=Avnet, Contact Plating=Tin,Matte, Manufacturer Part Number=TC1262-2.5VDBTR, Mount="Surface Mount", Number of Outputs=1, Number of Pins=3, Number of Regulators=1, Output Current=500mA, Output Type=Fixed, Packaging="Tape and Reel", Polarity=Positive, Pricing 1="1=0.51000, 25=0.43000, 100=0.39000 (USD)", Quiescent Current=80uA, Radiation Hardening=No, RoHS=Yes, Stock 1=2386, Supplier 1=Digi-Key